# EAGLE board restrict_and_pad_shapes (EAGLE 9.6.2)
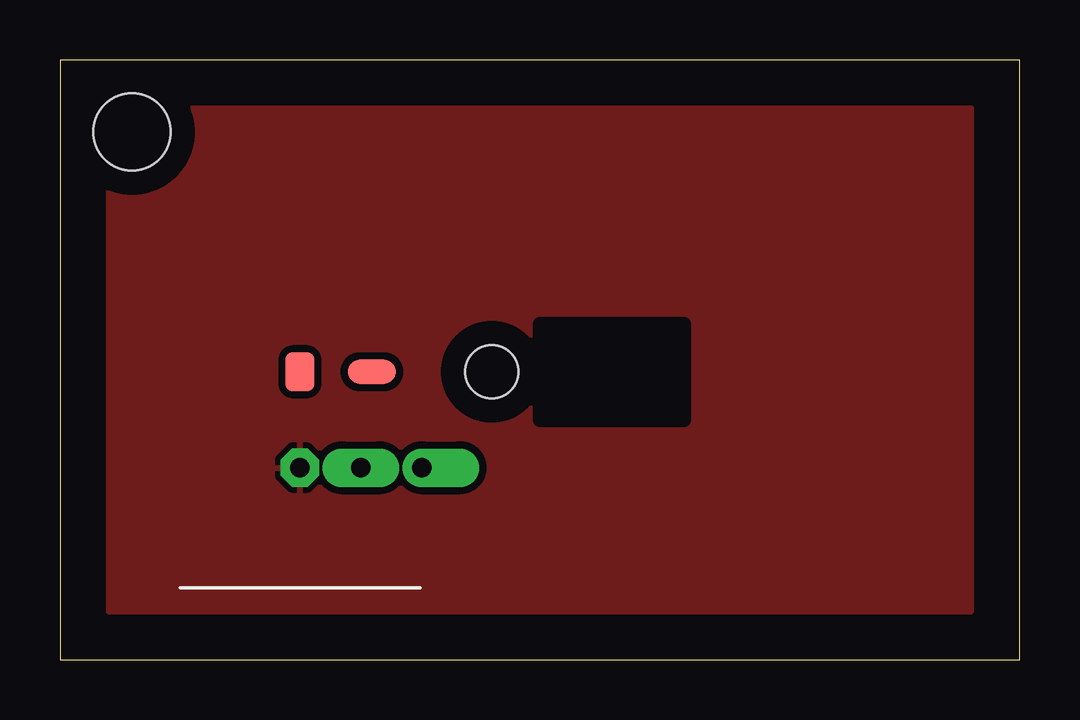
[diagram p0: board, top side]

Size 40 x 25 mm. Coordinates in mm from the lower left corner, seen from the top.
Outline: 0,0 40,0 40,25 0,25 0,0
Copper layers used: Top
Holes 3.2 mm at 3,22
tRestrict: area 20,10 to 26,14
bRestrict: area 30,10 to 34,14

## Footprints (pad centres in the part's own frame; a part is rotated, then mirrored left to right if it is on the bottom)
MIX = drill 0.8 pad 1.6 octagon: 1 0,0 | drill 0.8 pad 1.6 long: 2 2.54,0 | drill 0.8 pad 1.6 offset: 3 5.08,0 | smd 1.2 x 1.6: A 0,4 | smd 2 x 1: B 3,4 | hole 2.2: 8,4

## Placement (x,y rotation side)
U1  MIX  [MIX]  10,8 0 top

## Library data of the parts
U1 = hand

## Nets
GND: U1.1

## Tracks (layer width: path | path; a pad name or v marks a point on that pad's centre or on a via)
GND
  pour Top (isolate 0.3): 2,2 38,2 38,23 2,23